# Altium PCB Acoustics Board.PcbDoc (part 3 of 3)
Units mil, origin at the board's own origin, x right, y up, seen from the top; angles counter-clockwise.
Board outline 4100 x 5000 mil, 4 copper layers (Top Layer, Middle 1 Layer, Middle 2 Layer, Bottom Layer), stack 53.912 mil thick; 240 components, 165 nets, 793 pads, 573 vias.
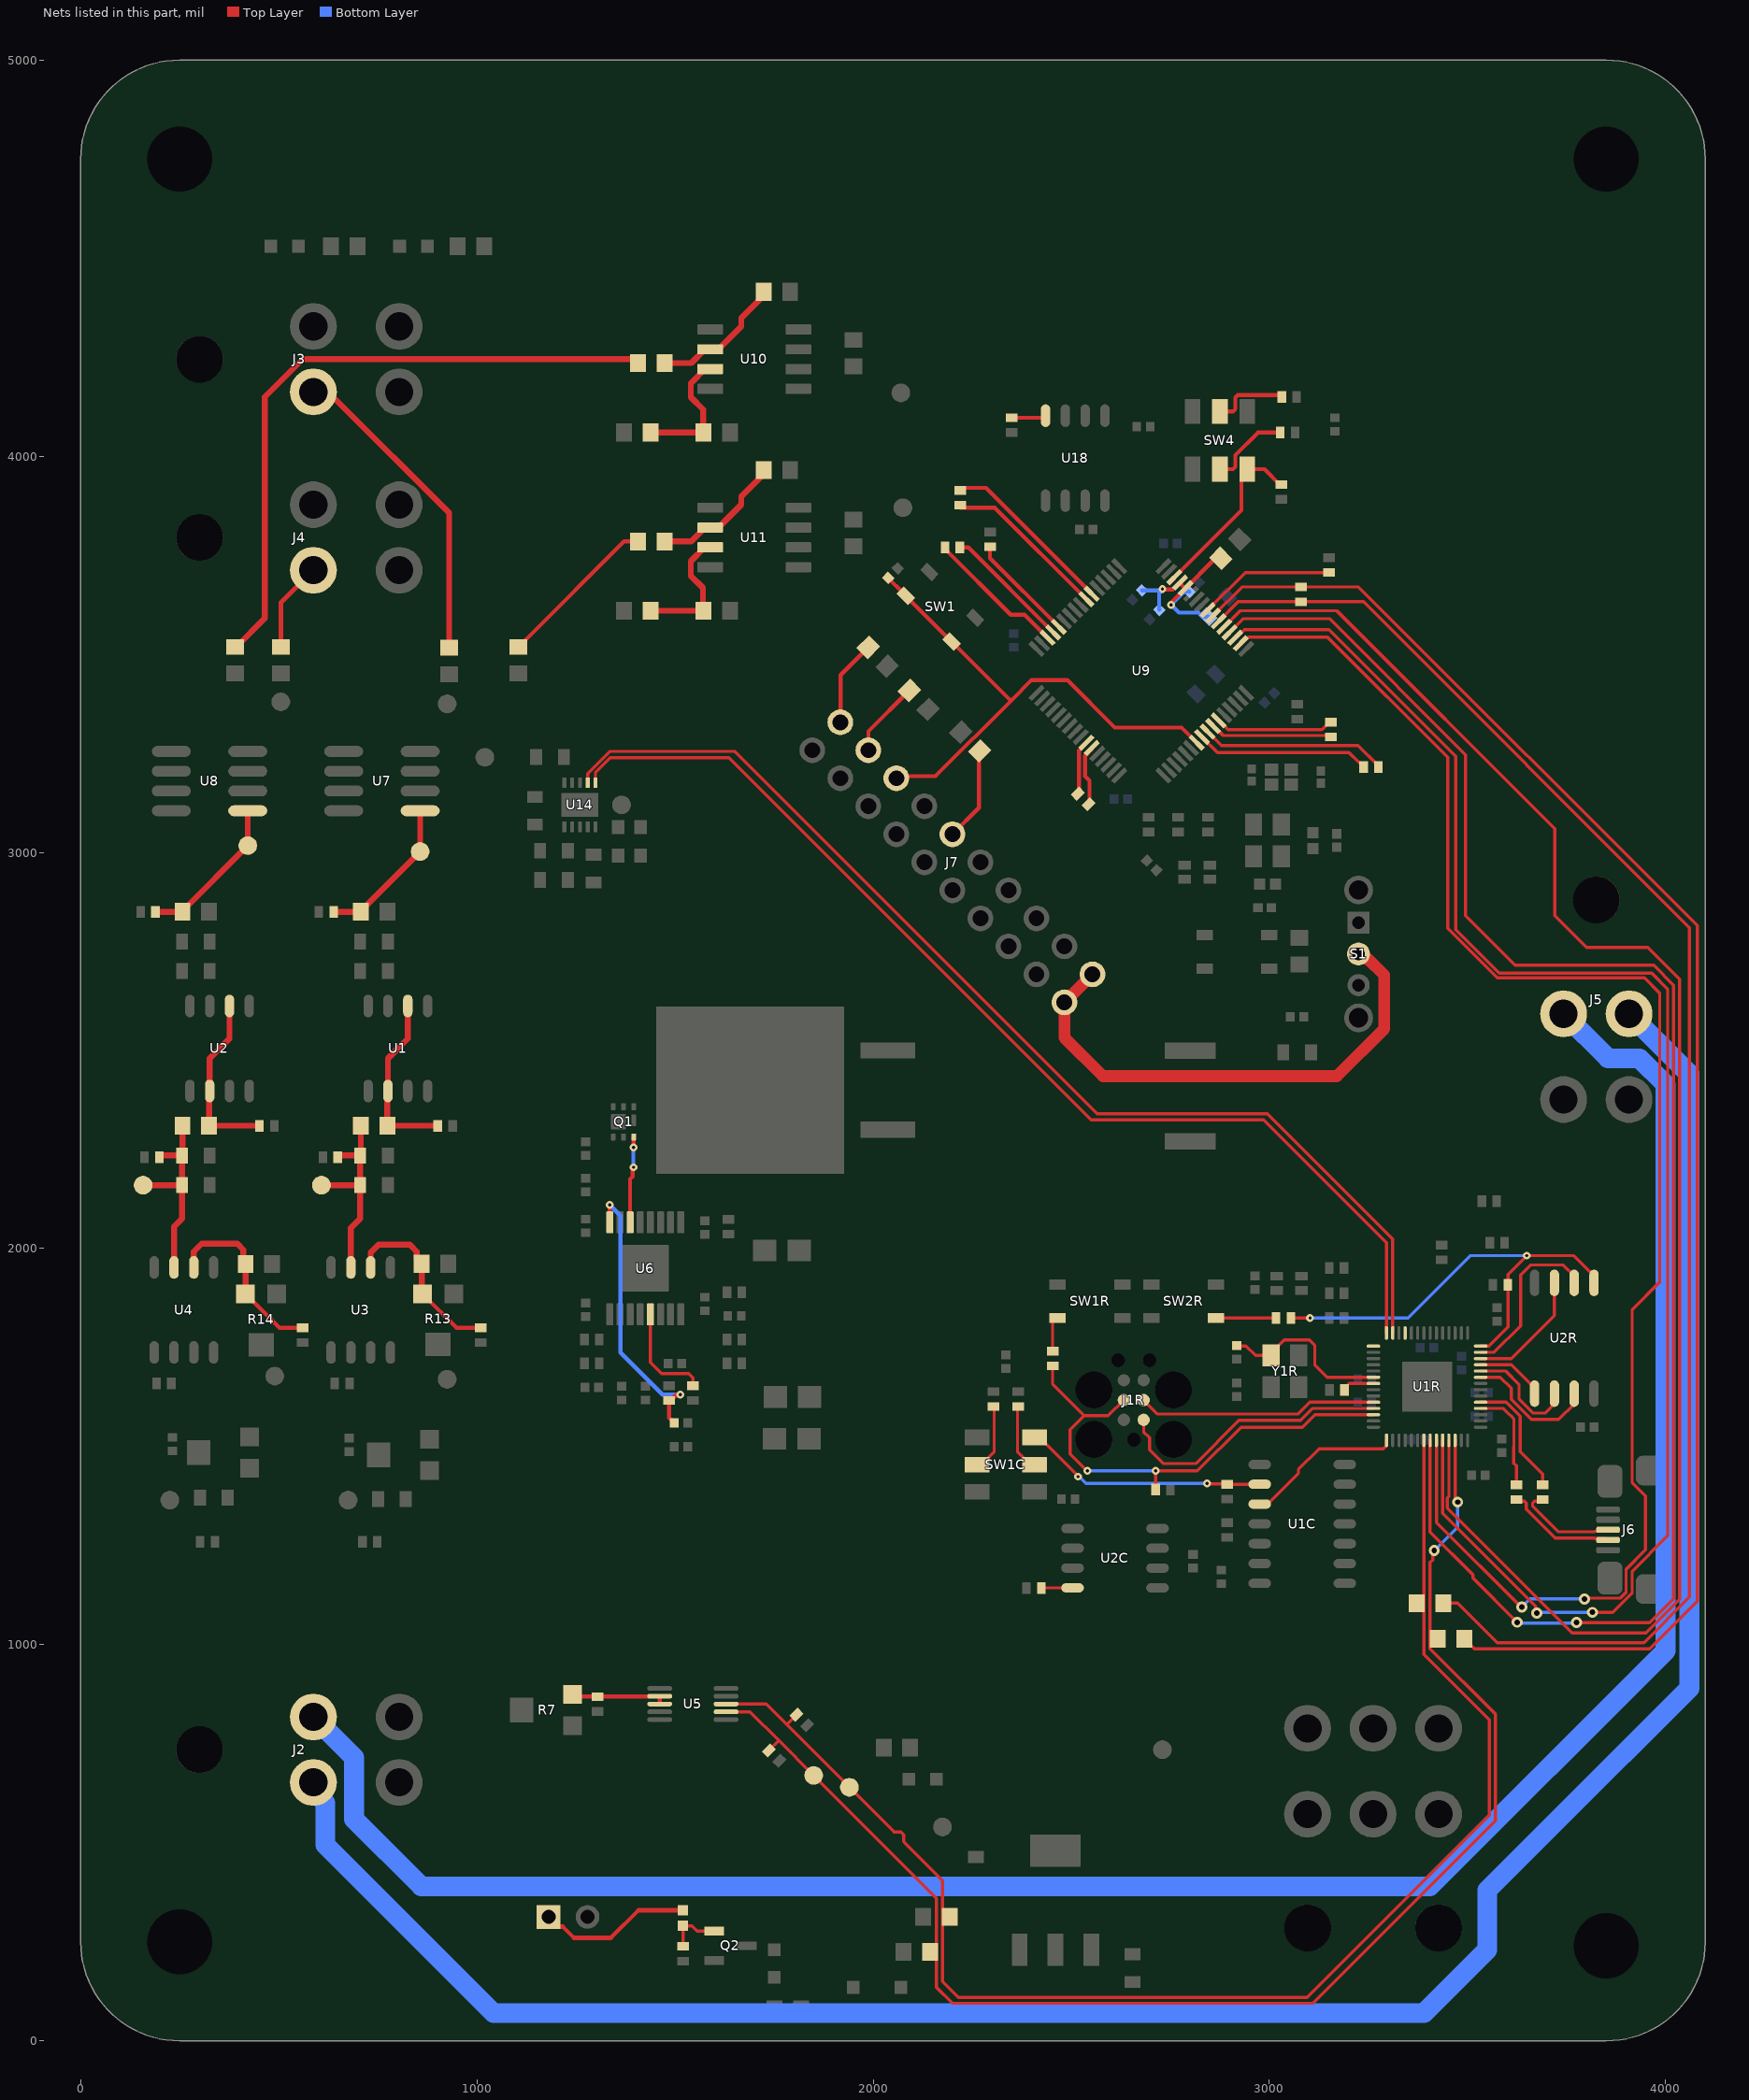
[diagram p5: the nets of this part, all layers, seen from the top]

## Via types
v1: diameter 19.68, hole 7.87, Top Layer to Bottom Layer, tented both sides, 176 vias
v2: diameter 28, hole 14, Top Layer to Bottom Layer, tented both sides, 168 vias
v3: diameter 30, hole 8, Top Layer to Bottom Layer, tented both sides, 106 vias
v4: diameter 20, hole 7.87, Top Layer to Bottom Layer, tented both sides, 99 vias
v5: diameter 31.5, hole 15.75, Top Layer to Bottom Layer, tented both sides, 19 vias
v6: diameter 24, hole 10, Top Layer to Bottom Layer, tented both sides, 3 vias
v7: diameter 23.62, hole 11.81, Top Layer to Bottom Layer, tented both sides, 2 vias

## Nets (pads, with @x,y where several pads share a name; then routed paths per layer and width w, separated by ;. In a path a pad name is that pad's centre, name@x,y a point inside that pad or via, vN(x,y) a via of type N, cw(c..) or ccw(c..) an arc to the next point about the centre after c; other vN are vias at no path point) (continued)
NetDNP7_2: DNP7.2 U9.44 | length 273.6
  Top Layer w10: DNP7.2@2295,3771.3 2295,3742.71 U9.44@2468.24,3569.47
NetDNP8_1: DNP8.1 U9.45 | length 324.4
  Top Layer w10: DNP8.1@2218.7,3770 2239.87,3770 U9.45@2454.32,3555.55
NetDNP8_2: DNP8.2 U9.46 | length 356
  Top Layer w10: DNP8.2@2181.3,3770 2181.3,3766.06 2347.36,3600 2382.03,3600 U9.46@2440.4,3541.63
NetDNP9_1: DNP9.1 U9.24 | length 345.3
  Top Layer w8: U9.24@2844.07,3611.23 2939.14,3706.3 DNP9.1@3150,3706.3
NetDNP10_1: DNP10.1 U9.58 | length 137.7
  Top Layer w10: DNP10.1@2516.78,3148.22 2519.56,3151.01 2519.56,3257.47 2537.84,3275.75 U9.58@2537.84,3277.16
NetDNP10_2: DNP10.2 U9.59 | length 151.4
  Top Layer w10: DNP10.2@2543.22,3121.78 2546.01,3124.56 2546.01,3181.35 2534.82,3192.54 2534.82,3243.47 U9.59@2551.76,3260.41
NetDNP12_1: DNP12.1 U9.9 | length 470.5
  Top Layer w8: U9.9@2844.07,3305 2879.07,3270 3223.94,3270 3275,3218.94 DNP12.1@3275,3215
NetDNP12_2: DNP12.2 U9.8 | length 441.3
  Top Layer w8: U9.8@2830.15,3291.08 2869.23,3252 3200.6,3252 3226.83,3225.76 3230.77,3225.76 3237.6,3218.94 DNP12.2@3237.6,3215
NetDNP13_1: DNP13.1 U9.11 | length 300.3
  Top Layer w8: U9.11@2871.9,3332.84 2873.32,3332.84 2896.16,3310 3132.36,3310 3151.06,3328.7 DNP13.1@3155,3328.7
NetDNP13_2: DNP13.2 U9.10 | length 306.9
  Top Layer w8: U9.10@2857.99,3318.92 2859.4,3318.92 2883.32,3295 DNP13.2@3155,3295
NetDNP14_1: DNP14.1 SB6.1 U9.23 | length 3960.8
  Top Layer w8: U9.23@2857.99,3597.31 2930.68,3670 DNP14.1@3080,3670 3225,3670 4080,2815 4080,1110 3960,990 3517,990 3510.5,996.5 3508,996.5 3492,1012.5 SB6.1@3492,1015
NetDNP14_2: DNP14.2 SB7.1 U9.22 | length 3949.8
  Top Layer w8: U9.22@2871.9,3583.39 2921.11,3632.6 DNP14.2@3080,3632.6 3237.4,3632.6 4060,2810 4060,1120 3945,1005 3575,1005 3475,1105 SB7.1@3438.5,1105
NetDNP15_1: DNP15.1 U9.39 | length 413.5
  Top Layer w10: DNP15.1@2220,3870 2306.9,3870 U9.39@2537.84,3639.07
NetDNP15_2: DNP15.2 U9.38 | length 442.4
  Top Layer w10: DNP15.2@2220,3920 2284.74,3920 U9.38@2551.76,3652.99
NetDNP16_2: DNP16.2 R9.1 R13.3 U3.2 | length 465.2
  Top Layer w9.84: R13.3@860.96,1887.47 R13.3@862.57,1885.87 948.43,1800 DNP16.2@1010,1800
  Top Layer w15: U3.2@731.94,1952.28 731.94,1990 751.94,2010 830.95,2010 848.46,1992.49 848.46,1973.99 R9.1@860.96,1961.49 R13.3@860.96,1887.47
NetDNP18_2: DNP18.2 R10.1 R14.3 U4.2 | length 472.9
  Top Layer w9.84: R14.3@416.26,1893.11 R14.3@416.26,1885.24 501.5,1800 DNP18.2@560,1800
  Top Layer w15: U4.2@285.63,1952.28 285.63,1992.28 305.63,2012.28 395.63,2012.28 410.63,1997.28 410.63,1966.29 R10.1@416.29,1960.63 416.29,1908.89 ; R14.3@416.26,1893.11 R14.3@416.26,1908.86
NetDNP20_1: DNP20.1 R3.2 U1.2 U1.6 | length 450.8
  Top Layer w15: U1.2@825.63,2612.28 825.63,2530 775.63,2480 U1.6@775.63,2397.72 774.13,2396.22 R3.2@774.13,2310 DNP20.1@901.3,2310
NetDNP24_1: DNP24.1 R4.2 U2.2 U2.6 | length 450.8
  Top Layer w15: U2.2@375.63,2612.28 375.63,2530 325.63,2480 U2.6@325.63,2397.72 324.13,2396.22 R4.2@324.13,2310 DNP24.1@451.3,2310
NetJ3_1: J3.1 SB2.1 | length 809
  Top Layer w15: J3.1@587.4,4162.32 607.13,4142.59 644.28,4142.59 930,3856.87 SB2.1@930,3517
NetJ4_1: J4.1 SB3.1 | length 228
  Top Layer w12: SB3.1@505,3518.5 505,3629.92 J4.1@587.4,3712.32
NetJ7_1: J7.1 J7.2 S1.2 | length 1308.7
  Top Layer w30: J7.1@2553.55,2692.16 J7.2@2482.84,2621.45 2482.84,2532.16 2580,2435 3170,2435 3290,2555 3290,2690 3249.26,2730.74 3245.04,2730.74 3232.04,2743.74 S1.2@3225,2743.74
NetJ7_11: J7.11 R38.2 | length 239.1
  Top Layer w10: J7.11@2200,3045.71 2266.92,3112.63 2266.92,3254.54 R38.2@2268.69,3256.31
NetJ7_17: J7.17 R39.2 | length 194
  Top Layer w10: J7.17@1987.87,3257.84 1987.87,3305.24 R39.2@2091.31,3408.69 ; J7.17@1988.58,3262.84 J7.17@1988.84,3262.84
NetJ7_19: J7.19 R40.2 | length 212.7
  Top Layer w10: J7.19@1917.87,3333.55 1917.87,3447.62 R40.2@1987.62,3517.38
NetJ8_1: J8.1 R32.1 | length 390
  Top Layer w11: J8.1@1180.79,312.83 1205.29,288.33 1216.67,288.33 1245,260 1338,260 1407.68,329.68 R32.1@1520,329.68
NetQ1_3: Q1.3 U6.14 | length 219.2
  Top Layer w9.84: U6.14@1386.61,2066.14 1386.61,2175.47 1393.12,2181.97 1393.12,2203.12 v1(1395,2205) ; v1(1395.3,2255.3) 1395.3,2281.32 Q1.3@1395.59,2281.61
  Bottom Layer w9.84: v1(1395,2205) 1395.15,2205.15 1395.15,2255.15 v1(1395.3,2255.3)
NetQ2_1: Q2.1 R31.2 R32.2 | length 135.9
  Top Layer w8: R31.2@1520,238.7 R32.2@1520,290.31 1542.59,290.31 1555.41,277.5 Q2.1@1599,277.5
NetR2C_1: R2C.1 SW1C.2 | length 172.3
  Top Layer w7.87: R2C.1@2366.34,1601.26 2364.37,1599.29 2364.37,1486.1 2395.87,1454.61 SW1C.2@2407.68,1454.61
NetR3C_1: R3C.1 SW1C.5 | length 172.3
  Top Layer w7.87: SW1C.5@2262.01,1454.61 2273.82,1454.61 2305.32,1486.1 2305.32,1599.29 R3C.1@2303.35,1601.26
NetR6C_1: R6C.1 U2C.8 | length 78.7
  Top Layer w7.87: R6C.1@2424.41,1143.39 U2C.8@2503.15,1143.39
NetR6R_1: R6R.1 SW1R.A2 | length 91.3
  Top Layer w7.87: R6R.1@2452.95,1741.02 2452.95,1815.83 2461.81,1824.68 SW1R.A2@2465.75,1824.68
NetR7_3: R7.3 R8.1 U5.2 U5.3 | length 242.9
  Top Layer w10: R7.3@1240.87,874.68 1246.54,869.02 R8.1@1305,869.02 1434.27,869.02 1435.26,870 U5.2@1461.34,870 U5.3@1461.34,850.31
NetR7R_1: R7R.1 SW2R.A1 | length 151.6
  Top Layer w7.87: SW2R.A1@2865.35,1824.68 R7R.1@3016.93,1824.68
NetR12_1: R12.1 SB4.1 | length 1654.9
  Top Layer w15: SB4.1@390,3518.5 392.5,3518.5 465,3591 465,4150 560,4245 1402.4,4245 R12.1@1412.4,4235
NetR12_2: R12.2 R23.2 U10.2 | length 350.6
  Top Layer w15: R12.2@1467.6,4235 1540.98,4235 1575.98,4270 1592.72,4270 1609.45,4270 1667.13,4327.68 1667.13,4348.75 1728.46,4410.08 R23.2@1728.46,4415
NetR20_2: R20.2 U6.5 | length 264.8
  Top Layer w8: U6.5@1437.8,1833.86 1437.8,1712.2 1465.63,1684.37 1534.27,1684.37 1545,1673.63 R20.2@1545,1653.7
NetR24_1: R24.1 R25.1 U10.3 | length 337.7
  Top Layer w15: R25.1@1438.5,4060 R24.1@1571.5,4060 1571.5,4117.62 1540,4149.12 1540,4184.02 1575.98,4220 U10.3@1592.72,4220
NetR26_1: R26.1 SB5.1 | length 413.4
  Top Layer w10: SB5.1@1105,3518.5 1107.5,3518.5 1122.5,3533.5 1122.5,3536 1371.5,3785 R26.1@1406.5,3785
NetR26_2: R26.2 R27.2 U11.2 | length 350.6
  Top Layer w15: R26.2@1467.6,3785 1540.98,3785 1575.98,3820 1592.72,3820 1609.45,3820 1667.13,3877.68 1667.13,3898.75 1728.46,3960.08 R27.2@1728.46,3965
NetR28_1: R28.1 R29.1 U11.3 | length 320.1
  Top Layer w15: R29.1@1437.52,3610 1570.52,3610 1570.52,3667.62 1540,3698.14 1540,3735 U11.3@1575,3770
NetR41_1: R41.1 U18.8 | length 87
  Top Layer w10: R41.1@2350,4097.4 2430.12,4097.4 U18.8@2435,4102.28
NetR44_1: R44.1 SW4.2 | length 208.5
  Top Layer w10: SW4.2@2875,3967.17 2908.35,3967.17 2914.21,3973.02 2914.21,4002.8 2971.41,4060 R44.1@3027.6,4060
NetR46_1: R46.1 SW4.5 | length 192.7
  Top Layer w10: SW4.5@2875,4112.83 2908.35,4112.83 2914.21,4118.69 2914.21,4148.47 2920.07,4154.33 3026.97,4154.33 R46.1@3031.3,4150
NetU1R_11: U1R.11
NetU1R_15: U1R.15
"Point Filter L": DNP19.1 R1.2 TP5.TP U7.5 | length 385.4
  Top Layer w15: DNP19.1@638.7,2850 R1.2@707.13,2850 707.13,2852.5 TP5.TP@856.77,3002.14 U7.5@856.77,3105
"Point Filter R": DNP23.1 R2.2 TP6.TP U8.5 | length 391.6
  Top Layer w15: DNP23.1@188.7,2850 R2.2@257.13,2850 257.13,2852.5 TP6.TP@421.77,3017.14 U8.5@421.77,3105
"Post Filter Amp L": C3.1 DNP21.1 L3.1 R3.1 TP1.TP U3.3 | length 526.1
  Top Layer w15: TP1.TP@607.63,2160 C3.1@705.63,2160 ; DNP21.1@648.7,2230 648.7,2231.67 652.03,2235 L3.1@705.63,2235 ; U3.3@681.94,1952.28 681.94,2051.62 705.63,2075.32 C3.1@705.63,2160 ; R3.1@707.13,2310 707.13,2236.5 L3.1@705.63,2235 ; C3.1@705.63,2160 L3.1@705.63,2235
"Post Filter Amp R": C4.1 DNP25.1 L4.1 R4.1 TP4.TP U4.3 | length 524.6
  Top Layer w15: TP4.TP@157.63,2160 C4.1@255.63,2160 ; DNP25.1@198.7,2230 198.7,2231.67 202.03,2235 L4.1@255.63,2235 ; U4.3@235.63,1952.28 235.63,2055.32 255.63,2075.32 C4.1@255.63,2160 ; R4.1@257.13,2310 257.13,2236.5 L4.1@255.63,2235 ; C4.1@255.63,2160 L4.1@255.63,2235
QSPI_SCLK_RP2040: U1R.52 U2R.6 | length 283
  Top Layer w7.87: U1R.52@3533.17,1690.83 3595.87,1690.83 3630.12,1656.57 3630.12,1620.04 3665.63,1584.53 3695.67,1584.53 3719.29,1608.15 U2R.6@3719.29,1629.8
QSPI_SD0_RP2040: U1R.53 U2R.5 | length 178.4
  Top Layer w7.87: U1R.53@3533.17,1706.57 3610.43,1706.57 3669.29,1647.72 U2R.5@3669.29,1633.8 U2R.5@3669.29,1629.8
QSPI_SD1_RP2040: U1R.55 U2R.2 | length 435.6
  Top Layer w7.87: U1R.55@3533.17,1738.07 3567.13,1738.07 3634.06,1805 3634.06,1933.15 3659.51,1958.6 3729.08,1958.6 3729.13,1958.54 3741.73,1958.54 3769.29,1930.98 U2R.2@3769.29,1913.32 U2R.2@3769.29,1909.33
QSPI_SD2_RP2040: U1R.54 U2R.3 | length 309.4
  Top Layer w7.87: U1R.54@3533.17,1722.32 3610.43,1722.32 3719.29,1831.18 U2R.3@3719.29,1909.33
QSPI_SD3_RP2040: U1R.51 U2R.7 | length 334.1
  Top Layer w7.87: U1R.51@3533.17,1675.08 3582.65,1675.08 3610.43,1647.29 3610.43,1619.96 3661.61,1568.78 3729.92,1568.78 3769.29,1608.15 U2R.7@3769.29,1629.8
QSPI_SS_RP2040: R5R.2 R7R.2 U1R.56 U2R.1 | length 1162
  Top Layer w7.87: R7R.2@3054.33,1824.68 v1(3102.56,1824.69) ; U1R.56@3533.17,1753.82 3554.07,1753.82 3602.56,1802.3 3602.56,1934.92 v1(3649.8,1982.17) 3768.11,1982.17 3819.29,1930.98 U2R.1@3819.29,1913.32 U2R.1@3819.29,1909.33
  Bottom Layer w7.87: v1(3102.56,1824.69) 3349.55,1824.69 3507.03,1982.17 v1(3649.8,1982.17)
Reset: C22.1 J7.15 SW1.A1 SW1.A2 U9.7 | length 1371.5
  Top Layer w10: C22.1@2037.89,3684.37 C22.1@2037.89,3692.89 2074.88,3655.9 2074.88,3655.19 2345.07,3385 2350,3385 ; J7.15@2059.29,3192.13 2157.13,3192.13 2350,3385 ; U9.7@2816.23,3277.16 2778.39,3315 2610,3315 2490,3435 2400,3435 2350,3385
"RP2040 L": DNP27.1 R35.1 SB7.2 TP9.TP U1R.35 U5.8 | length 3632.7
  Top Layer w8: U5.8@1628.66,850.31 1729.83,850.31 1781.85,798.29 ; DNP27.1@1806.78,823.22 1782.29,798.73 1781.85,798.29 ; TP9.TP@1940,640 2049.58,530.42 2052.41,527.59 2069.72,527.59 2076.79,520.52 2076.79,503.21 2079.62,500.38 2175,405 2175,150 2215,110 3095,110 3555,570 3555,810 3390,975 U1R.35@3389.96,1516.12 U1R.35@3389.96,1516.12 ; TP9.TP@1940,640.14 1781.85,798.29
"RP2040 R": DNP28.1 R34.1 SB6.2 TP10.TP U1R.40 U5.7 | length 3664
  Top Layer w8: U5.7@1628.66,830.63 1689.23,830.63 1761.71,758.15 ; DNP28.1@1736.78,733.22 1761.27,757.71 1761.71,758.15 ; TP10.TP@1849.86,670 1761.71,758.15 ; TP10.TP@1850,670 2160,360 2160,135 2200,95 3110,95 3570,555 3570,825 3405.71,989.29 3405.71,1207.53 3412.05,1213.87 3412.05,1233.71 v2(3415.87,1237.53) ; U1R.40@3468.7,1516.12 3468.7,1371.71 3475,1365.41 v2(3475,1360)
  Bottom Layer w8: v2(3415.87,1237.53) 3475,1296.66 v2(3475,1360)
RUN_RP2040: J1R.4 R4R.2 R6R.2 U1R.26 | length 1275.3
  Top Layer w7.87: R6R.2@2452.95,1703.62 2452.95,1657.73 2532.64,1578.04 ; v1(2540.89,1438.86) 2539.57,1438.86 2497.24,1481.19 2497.24,1542.63 2532.64,1578.04 ; J1R.4@2632.68,1617.6 2593.11,1578.04 2532.64,1578.04 ; R4R.2@2712.8,1391.61 v1(2712.8,1438.86) 2818.34,1438.86 2928.57,1549.09 3083.49,1549.09 3114.99,1580.59 U1R.26@3262.5,1580.59
  Bottom Layer w7.87: v1(2540.89,1438.86) v1(2712.8,1438.86)
SCK_RP2CAN: U1C.10 U1R.29 | length 400.1
  Top Layer w7.87: U1C.10@2975.59,1355 2995.84,1355 3073.21,1432.37 3073.21,1442.14 3125.44,1494.37 3287.01,1494.37 3295.47,1502.83 U1R.29@3295.47,1516.12
SCLK: U1R.13 U14.7 | length 2824.7
  Top Layer w7.87: U14.7@1279.68,3175.71 1279.68,3198.54 1336.15,3255 1650,3255 2565,2340 2995,2340 3311.22,2023.78 U1R.13@3311.22,1786.79
SDATA: U1R.14 U14.6 | length 2772.6
  Top Layer w7.87: U14.6@1299.37,3175.71 1299.37,3202.08 1336.15,3238.85 1636.15,3238.85 2550,2325 2985,2325 3295.47,2014.53 U1R.14@3295.47,1786.79
SPI1_CLK: U1R.38 U9.19 | length 4089.5
  Top Layer w8: U9.19@2913.66,3541.63 2916.49,3541.63 2937.46,3562.6 3150,3562.6 3470,3242.6 3470,2805 3580,2695 3965,2695 4005,2655 4005,1275 3915.57,1185.57 3915.57,1131.25 3866.06,1081.75 v2(3815,1081.75) ; U1R.38@3437.2,1516.12 3437.2,1331.47 3671.45,1097.22 3671.45,1083.55 v2(3675,1080)
  Bottom Layer w8: v2(3675,1080) 3676.75,1081.75 v2(3815,1081.75)
SPI1_MISO: U1R.36 U9.20 | length 4276.5
  Top Layer w8: U9.20@2899.74,3555.55 2934.19,3590 3151.4,3590 3495,3246.4 3495,2840 3620,2715 3970,2715 4020,2665 4020,1116.32 3959.55,1055.87 v2(3775,1055.87) ; U1R.36@3405.71,1516.12 3405.71,1284.29 3513.44,1176.56 3513.44,1168.31 v2(3625,1056.75)
  Bottom Layer w8: v2(3625,1056.75) 3627.62,1054.13 3773.25,1054.13 v2(3775,1055.87)
SPI1_MOSI: U1R.39 U9.21 | length 4169.2
  Top Layer w8: U9.21@2885.82,3569.47 2926.36,3610 3170,3610 3720,3060 3720,2840 3800,2760 3955,2760 4035,2680 4035,1115 3950,1030 3764.28,1030 3449.13,1345.16 3449.13,1370.72 3452.95,1374.54 U1R.39@3452.95,1516.12
STM_CSn: U1R.37 U9.18 | length 4055.4
  Top Layer w8: U9.18@2927.58,3527.71 2930.41,3527.71 2946.35,3543.65 3146.35,3543.65 3450,3240 3450,2808.68 3575.22,2683.46 3946.54,2683.46 3985,2645 3985,1915.68 3915.57,1846.25 3915.57,1408.85 3949.42,1375 3949.42,1239.42 3900.1,1190.1 3900.1,1132.11 3885.61,1117.61 3797.61,1117.61 v2(3795,1115) ; U1R.37@3421.46,1516.12 3421.46,1308.54 3634.79,1095.21 v2(3636.88,1095.21)
  Bottom Layer w8: v2(3636.88,1095.21) 3657.85,1116.19 v2@3795,1116.19
SWCLK_RP2040: J1R.3 U1R.24 | length 606.9
  Top Layer w7.87: J1R.3@2682.68,1617.6 2718.11,1582.16 3072.01,1582.16 3101.94,1612.09 U1R.24@3262.5,1612.09
SWDIO_RP2040: J1R.1 U1R.25 | length 718.6
  Top Layer w7.87: J1R.1@2682.68,1567.6 2682.68,1537.06 2697.24,1522.49 2697.24,1492.56 2732.64,1457.16 2813.89,1457.16 2923.14,1566.41 3078.54,1566.41 3108.46,1596.34 U1R.25@3262.5,1596.34
TERM_DET_RP2CAN: R1C.2 SW1C.3 U1C.9 | length 621.6
  Top Layer w7.87: SW1C.3@2407.68,1523.5 2419.49,1523.5 2517.46,1425.53 v1(2517.46,1424.35) ; v1(2842.72,1407.36) 2843.9,1406.18 2896.65,1406.18 R1C.2@2897.83,1405 ; R1C.2@2893.9,1405 R1C.2@2897.83,1405 ; U1C.9@2975.59,1405 R1C.2@2897.83,1405
  Bottom Layer w7.87: v1(2517.46,1424.35) 2519.75,1424.35 2536.74,1407.36 v1(2842.72,1407.36)
TERM_DET_STM: R42.2 SW4.3 U9.30 | length 450.4
  Top Layer w10: U9.30@2760.55,3694.74 2929.21,3863.41 2929.21,3952.48 SW4.3@2943.9,3967.17 2987.6,3967.17 3026.06,3928.7 R42.2@3030,3928.7
"Transducer L": J2.2 J5.1 | length 5687.6
  Bottom Layer w50: J2.2@587.4,817.68 690,715.08 690,560 860,390 3405,390 4000,985 4000,2413.75 3933.75,2480 3854.92,2480 J5.1@3742.32,2592.6
"Transducer R": J2.1 J5.2 | length 5981.8
  Bottom Layer w50: J2.1@587.4,652.32 587.4,631.19 617.4,601.19 617.4,494.6 1042,70 3390,70 3550,230 3550,380 3720,550 4060,890 4060,2440.28 J5.2@3907.68,2592.6
USB_N: J6.2 R3R.1 | length 282.6
  Top Layer w7.87: R3R.1@3623.32,1366.38 3627.1,1362.6 3643.77,1362.6 3648.38,1357.99 3648.38,1342.58 3721.7,1269.27 3820.54,1269.27 3821.47,1268.35 3850.75,1268.35 J6.2@3854.69,1264.41
USB_P: J6.3 R2R.1 | length 256.3
  Top Layer w7.87: R2R.1@3689.33,1366.38 3685.54,1362.6 3668.87,1362.6 3664.26,1357.99 3664.26,1349.16 3728.27,1285.14 3820.54,1285.14 3821.47,1286.06 3850.75,1286.06 J6.3@3854.69,1290
USB_RP2040_N: R3R.2 U1R.46 | length 263.6
  Top Layer w7.87: U1R.46@3533.17,1596.34 3590.75,1596.34 3600.15,1586.93 3612.84,1574.25 3616.9,1570.19 3616.9,1498.74
  Top Layer w8: 3616.9,1498.74 3616.9,1458.11 3623.32,1451.69 R3R.2@3623.32,1403.78
USB_RP2040_P: R2R.2 U1R.47 | length 310.5
  Top Layer w7.87: U1R.47@3533.17,1612.09 3597.27,1612.09 3606.68,1602.68 3632.83,1576.52 3632.83,1487.42 3632.9,1487.36
  Top Layer w8: 3632.9,1487.36 3632.9,1487.11 3689.33,1430.68 R2R.2@3689.33,1403.78
VCC: C14.1 R17.1 U6.16 | length 718.6
  Top Layer w11: v1(1335,2110) 1335.22,2109.78 1335.22,2066.36 U6.16@1335.43,2066.14 ; C14.1@1497.87,1560 1497.87,1560.79 1492.35,1566.31 1491.56,1566.31 1485,1572.87 R17.1@1485,1616.3 1488.94,1616.3 1502.03,1629.39 1511.3,1629.39 v1(1512.96,1631.05)
  Bottom Layer w11: v1(1335,2110) 1362.26,2082.74 1362.26,1737.74 1468.95,1631.05 v1(1512.96,1631.05)
VDDA: C25.1 C26.1 C27.1 C28.1 SB1.1 U9.28 U9.29 | length 496.3
  Top Layer w10: v4(2730,3665) 2731.12,3663.88 2756.11,3663.88 2773.05,3680.82 2786.97,3666.9 U9.28@2788.39,3666.9 ; v4(2751.78,3625) 2753.69,3626.91 2753.69,3632.21 U9.28@2788.39,3666.9 ; SB1.1@2858.11,3736.63 U9.28@2788.39,3666.9
  Bottom Layer w10: C26.1@2678.38,3661.79 2678.93,3661.23 v4@2723.53,3661.23 ; C27.1@2722.11,3613.22 C27.1@2722.11,3612.11 2721.55,3612.67 2721.55,3653.85 2730,3662.29 v4(2730,3665) ; C25.1@2797.89,3657.89 2797.33,3658.45 2788.81,3658.45 2786.47,3656.1 2782.88,3656.1 v4(2751.78,3625) 2771.78,3605 2820.86,3605 2830.86,3595 C28.1@2845,3595
XIN_RP2040: C1R.1 U1R.20 Y1R.1 | length 443.1
  Top Layer w7.87: C1R.1@2917.52,1755.2 2918.8,1753.92 2941.14,1753.92 2964.86,1730.2 Y1R.1@3004.13,1730.2 3004.13,1736.1 3037.6,1769.57 3100.68,1769.57 3114.37,1755.88 3114.37,1706.57 3145.87,1675.08 U1R.20@3262.5,1675.08
XOUT_RP2040: R1R.1 U1R.21 | length 82.1
  Top Layer w7.87: R1R.1@3189.25,1643.58 3189.25,1647.52 3201.06,1659.33 U1R.21@3262.5,1659.33
pads on no net: DNP9.2 J1. J1R.A J1R.B J1R.C J1R.D J1R.E J1R.F J1R.G J2. J3. J4. J5. J6.4 R5.1 R6.1 R7.1 R13.1 R14.1 S1.1 S1.4 S1.5 SW1R.A1 SW2R.A2 U1.1 U1.5 U1.8 U1C.3 U1C.5 U1C.8 U2.1 U2.5 U2.8 U3.1 U3.5 U3.8 U4.1 U4.5 U4.8 U9.14 U9.17 U9.26 U9.33 U9.36 U9.40 U9.41 U9.42 U9.52 U9.55 U9.60 U9.62 U10.1 U10.5 U10.8 U11.1 U11.5 U11.8 Y1.1

## Polygon pours and split planes (outlines as drawn)
5V on Top Layer "5V_L01_P099" (solid, pour order 99): 1445,1540 1235,1540 1170,1605 1170,2025 1215,2070 1215,2085 1155,2145 1095,2145 1050,2100 1050,1485 1155,1380 1455,1380 1505,1430 1505,1480
5V on Top Layer "5V_L01_P113" (solid, pour order 113): 1620,1095 1290,1095 1050,1335 1050,1500 1090,1540 1490,1540 1510,1520 1510,1475 1545,1440 2010,1440 2025,1425 2115,1335 2115,1230 1800,915
5V on Top Layer "5V_L01_P091" (solid, pour order 91): 1299.37,2110.63 1305,2105 1305,2067.96 1298.2,2061.16 1088.84,2061.16 1050,2100 1050,2230 1090,2270 1190,2270 1220,2240 1220,2151.54 1260.91,2110.63
GND on Top Layer "GND_L01_P161" (solid, remove dead copper, pour order 161): 0,5000 4100,5000 4100,0 0,0
5V on Top Layer "5V_L01_P011" (solid, pour order 11): 930,2445 1050,2325 1050,2230 1080,2200 1200,2200 1220,2220 1220,2280 1240,2300 1290,2300 1321.18,2268.82 1373.82,2268.82 1380,2275 1380,2307.33 1380,2450 1280,2550 910,2550 890,2530 890,2480
GND on Top Layer "GND_L01_P160" (solid, remove dead copper, pour order 160): 1805,1655 1890,1655 1890,1490 1805,1490
-5V on Top Layer "-5V_L01_P085" (solid, pour order 85): 1782.57,1635 1782.57,1470 1530,1470 1515,1485 1515,1615 1535,1635
3V3_STM32 on Top Layer "3V3_STM32_L01_P147" (solid, remove dead copper, pour order 147): 2565,2640 3059.62,2640 3059.62,2470 2565,2470
3V3 on Top Layer "3V3_L01_P145" (solid, pour order 145): 1185,2910 1185,2790 1335,2640 2000,2640 2630,2010 2835,2010 2910,2085 2910,2235 2850,2295 2550,2295 1995,2850 1320,2850 1245,2925 1200,2925
-5V on Top Layer "-5V_L01_P136" (solid, pour order 136): 270,3180 285,3165 285,3150 270,3135 180,3135 165,3120 165,3090 180,3075 285,3075 315,3045 315,3000 285,2970 165,2970 135,3000 135,3155.04 159.96,3180
-5V on Top Layer "-5V_L01_P121" (solid, pour order 121): 705,3180 720,3165 720,3150 705,3135 615,3135 600,3120 600,3090 615,3075 720,3075 750,3045 750,3000 720,2970 600,2970 570,3000 570,3155.04 594.96,3180
5V on Top Layer "5V_L01_P120" (solid, pour order 120): 915,2925 960,2925 990,2955 990,3150 960,3180 810,3180 795,3165 795,3150 810,3135 900,3135 915,3120 915,3030 885,3000 885,2955
5V on Top Layer "5V_L01_P119" (solid, pour order 119): 480,2925 525,2925 555,2955 555,3150 525,3180 375,3180 360,3165 360,3150 375,3135 465,3135 480,3120 480,3030 450,3000 450,2955
5V on Top Layer "5V_L01_P118" (solid, pour order 118): 1267.74,1744.14 1189.14,1744.14 1155,1710 1095,1710 1080,1725 1080,1845 1110,1875 1155,1875 1185,1845 1243.49,1845 1289.9,1798.59 1289.9,1752.21 1281.83,1744.14
-5V on Top Layer "-5V_L01_P115" (solid, pour order 115): 1417.78,816.92 1508.08,816.92 1530,795 1530,765 1530,675 1500,645 1425,645 1395,675 1395,795
-5V on Top Layer "-5V_L01_P109" (solid, pour order 109): 615,2670 720,2670 750,2640 750,2580 735,2565 615,2565 600,2580 600,2655
-5V on Top Layer "-5V_L01_P108" (solid, pour order 108): 165,2670 270,2670 300,2640 300,2580 285,2565 165,2565 150,2580 150,2655
5V on Top Layer "5V_L01_P107" (solid, pour order 107): 800.63,2480.63 800.63,2364.37 810,2355 840,2355 855,2370 855,2430 870,2445 930,2445 945,2460 945,2535 930,2550 870,2550 810,2490
5V on Top Layer "5V_L01_P106" (solid, pour order 106): 350.63,2480.63 350.63,2364.37 360,2355 390,2355 405,2370 405,2430 420,2445 480,2445 495,2460 495,2535 480,2550 420,2550 360,2490
-5V on Top Layer "-5V_L01_P105" (solid, pour order 105): 566.31,2100 551.31,2085 551.31,1950 596.31,1905 641.31,1905 656.31,1920 656.31,2085 641.31,2100
5V on Top Layer "5V_L01_P104" (solid, pour order 104): 626.31,1785 688.2,1785 706.94,1766.26 706.94,1704.37 716.31,1695 746.31,1695 761.31,1710 761.31,1830 701.31,1890 626.31,1890 611.31,1875 611.31,1800
5V on Top Layer "5V_L01_P103" (solid, pour order 103): 180,1785 241.89,1785 260.63,1766.26 260.63,1704.37 270,1695 300,1695 315,1710 315,1830 255,1890 180,1890 165,1875 165,1800
-5V on Top Layer "-5V_L01_P101" (solid, pour order 101): 120,2100 105,2085 105,1950 150,1905 195,1905 210,1920 210,2085 195,2100
-5V on Top Layer "-5V_L01_P087" (solid, pour order 87): 1439.15,1633.28 1446.27,1626.15 1446.27,1596.27 1400,1550 1240,1550 1185,1605 1185,1710 1210,1735 1280,1735 1288.37,1726.63 1288.37,1629.68 1298.05,1620 1335,1620 1348.28,1633.28
5V on Top Layer "5V_L01_P098" (solid, pour order 98): 2595,630 2490,735 1980,735 1770,945 1770,1230 1890,1350 2100,1350 2550,900 2775,900 2850,825 2850,705 2775,630
3V3 on Top Layer "3V3_L01_P097" (solid, pour order 97): 2535,450 2214.34,443.82 2115,543.16 2115,650 2185,720 2460,720 2574.34,605.66 2574.34,488.82
-5V on Top Layer "-5V_L01_P094" (solid, pour order 94): 1755,2050.29 1755,1950 1560,1950 1492.62,2017.38 1475.59,2017.38 1453.75,2039.23 1453.75,2093.82 1457.6,2097.68 1468.68,2097.68 1473.5,2092.86 1473.5,2038.58 1481.89,2030.19 1535.19,2030.19 1555.29,2050.29
GND on Top Layer "GND_L01_P088" (solid, pour order 88): 1292.55,2052.45 1242.45,2052.45 1230,2040 1230,1875 1257.7,1847.3 1292.3,1847.3 1320,1875 1365,1875 1395,1905 1395,1995 1380.87,2009.13 1335.87,2009.13
5V on Top Layer "5V_L01_P090" (solid, pour order 90): 1340.53,1866.89 1343.94,1863.48 1343.94,1806.25 1338.02,1800.34 1297.66,1800.34 1289.9,1792.57 1289.9,1752.21 1281.83,1744.14 1253.64,1744.14 1240.35,1757.43 1240.35,1830.03 1249.4,1839.08 1290.22,1839.08 1318.03,1866.89
3V3 on Top Layer "3V3_L01_P083" (solid, pour order 83): 1140,1065 1185,1020 1185,690 1140,645 1035,645 990,690 990,1020 1035,1065
GND on Top Layer "GND_L01_P081" (solid, pour order 81): 3885,1365 3900,1350 3900,1230 3885,1215 3825,1215 3810,1200 3810,1125 3855,1080 4005,1080 4020,1095 4020,1485 4005,1500 3855,1500 3810,1455 3810,1380 3825,1365
3V3 on Top Layer "3V3_L01_P062" (solid, pour order 62): 1193.36,3038.36 1236.64,3038.36 1260,3015 1260,2910 1245,2895 1200,2895 1185,2910 1185,3030
3V3 on Top Layer "3V3_L01_P075" (solid, pour order 75): 1095,3180 1170,3180 1185,3165 1185,3105 1170,3090 1050,3090 1035,3105 1035,3165 1050,3180
GND on Top Layer "GND_L01_P079" (solid, pour order 79): 2280,420 2400,300 2400,180 2355,135 2220,135 2190,165 2190,390 2220,420
GND on Top Layer "GND_L01_P077" (solid, pour order 77): 2905.83,105 3000,199.17 3000,315 3180,495 3180,600 3120,660 2970,660 2865,555 2865,345 2693.82,173.82 2629.65,173.82 2610,154.17 2610,120 2625,105
5V on Top Layer "5V_L01_P076" (solid, pour order 76): 2689.65,188.82 2850,349.17 2850,570 2955,675 3120,675 3180,735 3180,840 3120,900 2745,900 2595,750 2595,344.48 2514.34,263.82 2514.34,173.82 2544.34,143.82 2574.34,143.82 2619.34,188.82
3V3 on Top Layer "3V3_L01_P061" (solid, pour order 61): 2259.34,533.82 2214.34,488.82 2214.34,443.82 2229.34,428.82 2286.18,428.82 2409.34,305.66 2409.34,158.82 2424.34,143.82 2484.34,143.82 2499.34,158.82 2499.34,293.82 2574.34,368.82 2574.34,488.82 2529.34,533.82
3V3_STM32 on Bottom Layer "Bottom Layer-3V3_STM32 1" (solid, remove dead copper, pour order 156): 1757.5,3287.5 2360,3830 1850,4340 1757.5,4340
3V3_STM32 on Bottom Layer "Bottom Layer-3V3_STM32" (solid, remove dead copper, pour order 152): 2575,2470 2910,2470 3260,2820 3260,3850 2320,3850 1935,3465 1757.5,3287.5
5V on Bottom Layer "5V_L04_P132" (solid, pour order 132): 1510,4075 1160,4425 860,4425 780,4425 705,4350 705,3690 840,3555 1080,3555 1470,3165 1470,2820 1365,2715 1095,2715 1065,2685 1065,2550 1170,2445 1320,2445 1470,2295 1650,2295 1710,2355 1710,3555 1510,3753.26
-5V on Bottom Layer "-5V_L04_P134" (solid, pour order 134): 15,2865 150,2730 240,2730 300,2790 300,3045 120,3225 120,3345 390,3615 630,3615 660,3645 660,3750 570,3840 105,3840 15,3750
-5V on Bottom Layer "-5V_L04_P133" (solid, pour order 133): 690,4335 600,4425 355,4425 15,4085 15,3720 120,3615 630,3615 690,3675
5V on Bottom Layer "5V_L04_P131" (solid, pour order 131): 990,3015 1050,2955 1050,2850 1470,2430 1710,2430 2205,1935 2205,1215 2040,1050 1785,1050 1785,1515 1800,1530 1800,1965 1320,2445 855,2445 810,2490 810,2925 900,3015
5V on Bottom Layer "5V_L04_P130" (solid, pour order 130): 855,3030 975,3030 990,3015 990,2505 930,2445 690,2445 675,2460 675,2490 765,2580 765,2640 510,2895 510,2910 525,2925 750,2925
5V on Bottom Layer "5V_L04_P128" (solid, pour order 128): 413.62,2548.31 415.31,2550 930,2550 945,2535 945,2460 930,2445 405,2445 390,2460 390,2520 420,2550 442.5,2550
-5V on Bottom Layer "-5V_L04_P127" (solid, pour order 127): 375,2670 300,2745 270,2745 240,2715 240,2655 270,2625 360,2625 375,2640
-5V on Bottom Layer "-5V_L04_P126" (solid, pour order 126): 150,2115 135,2100 135,1980 150,1965 255,1965 360,2070 360,2100 285,2190 285,2505 345,2565 345,2610 315,2640 180,2640 150,2610
-5V on Bottom Layer "-5V_L04_P125" (solid, pour order 125): 210,3075 150,3015 150,2580 165,2565 240,2565 300,2625 300,2970
-5V on Bottom Layer "-5V_L04_P124" (solid, pour order 124): 750,2640 720,2670 165,2670 150,2655 150,2580 165,2565 735,2565 750,2580
5V on Bottom Layer "5V_L04_P123" (solid, pour order 123): 480,3030 525,3030 600,2955 780,2955 855,3030 975,3030 990,3015 990,2955 930,2895 510,2895 450,2955 450,3000
-5V on Bottom Layer "-5V_L04_P122" (solid, pour order 122): 750,3075 720,3105 240,3105 210,3075 210,2955 240,2925 300,2925 420,3045 525,3045 600,2970 720,2970 750,3000
-5V on Bottom Layer "-5V_L04_P117" (solid, pour order 117): 1470,2100 1560,2010 1560,1755 1395,1590 1185,1590 840,1935 135,1935 105,1965 105,2070 135,2100
5V on Bottom Layer "5V_L04_P116" (solid, pour order 116): 180,1890 165,1875 165,1800 180,1785 630,1785 1153.91,1230 1290,1230 1335,1275 1335,1440 1290,1485 1106.31,1485 701.31,1890
-5V on Bottom Layer "-5V_L04_P114" (solid, pour order 114): 1500,645 1530,675 1530,885 1635,990 1635,1575 1575,1635 1385,1635 1307.5,1557.5 1395,1470 1395,675 1425,645
-5V on Bottom Layer "-5V_L04_P112" (solid, pour order 112): 1335,1635 1200,1635 1185,1620 1185,1590 1230,1545 1455,1545 1530,1470 1660,1470 1705,1515 1705,1770.79 1470.79,1770.79 1455,1755
3V3 on Bottom Layer "3V3_L04_P111" (solid, pour order 111): 1185,690 1275,600 1995,600 2085,690 2400,690 2445,645 2445,555 2325,435 1080,435 990,525 990,705 1005,720 1170,720 1185,705
3V3 on Bottom Layer "3V3_L04_P110" (solid, pour order 110): 1140,1065 1185,1020 1185,690 1140,645 1035,645 990,690 990,1020 1035,1065
3V3 on Bottom Layer "3V3_L04_P096" (solid, pour order 96): 2190,555 2445,555 2580,690 2580,990 2655,1065 2730,1140 2730,1290 2670,1350 2415,1350 2070,1005 2070,675
-5V on Bottom Layer "-5V_L04_P092" (solid, pour order 92): 1725,2010 1785,1950 1785,1800 1725,1740 1530,1740 1515,1725 1455,1725 1440,1740 1440,1830 1530,1920 1530,1980 1560,2010
3V3 on Bottom Layer "3V3_L04_P065" (solid, pour order 65): 2730,2235 2415,1920 2415,1185 2460,1140 3525,1140 3875,1490 3875,2020 3660,2235 3645,2235
GND on Middle 2 Layer "GND_L03_P073" (solid, pour order 73): 0,5000 0,0 4100,0 4100,5000
GND on Middle 1 Layer "GND_L02_P072" (solid, pour order 72): 0,5000 0,0 4100,0 4100,5000

## Keep-outs
Keep-Out Layer:
  region: 3610,10 3610,290 3620,300 3620,325 3630,335 3630,355 3635,360 3640,360 3640,365 3645,370 3645,380 3655,390 3655,395 3705,445 3715,445 3730,460 3740,460 3755,475 3775,475 3785,485 3815,485 3820,490 4090,490 4090,185 4075,170 4075,155 4060,140 4060,125 4045,110 4045,105 3975,35 3945,35 3940,30 3935,25 3930,25 3920,15 3855,15 3850,10
  region: 4090,4505 4090,4785 4080,4795 4080,4820 4070,4830 4070,4850 4065,4855 4060,4855 4060,4860 4055,4865 4055,4875 4045,4885 4045,4890 3995,4940 3985,4940 3970,4955 3960,4955 3945,4970 3925,4970 3915,4980 3885,4980 3880,4985 3610,4985 3609.97,4701.36 3615,4680 3625,4665 3625,4650 3640,4635 3640,4620 3655,4605 3655,4600 3725,4530 3755,4530 3760,4525 3765,4520 3770,4520 3780,4510 3850,4505
  region: 9.97,4510 9.97,4785 19.97,4795 19.97,4820 29.97,4830 29.97,4850 34.97,4855 39.97,4855 39.97,4860 44.97,4865 44.97,4875 54.97,4885 54.97,4890 104.97,4940 114.99,4945.01 129.97,4955 139.99,4960.01 154.97,4970 175.07,4975.1 184.97,4980 214.09,4985 219.97,4985 489.97,4985 484.97,4700 480,4680 474.97,4665 469.95,4650.02 459.97,4635 455,4620 444.97,4605 439.99,4600.01 369.99,4539.99 344.97,4530 339.97,4525 334.97,4520 329.97,4520 315,4520 271.65,4510
  region: 489.97,10 489.97,285 485,295 479.97,320 474.99,330.01 469.97,350 459.97,360 459.97,365 454.97,375 444.97,385 444.97,390 394.97,440 384.99,444.99 369.97,455 359.99,459.99 344.97,470 330.09,474.91 314.97,480 255.03,490 9.88,490 14.97,200 19.94,180 24.97,165 29.99,150.02 39.97,135 44.94,120 54.97,105 59.96,100.01 129.96,39.99 154.97,30 159.97,25 164.97,20 169.97,20 184.94,20 228.3,10
  lines w10: 0,250 ccw(c250,250) 250,0 3850,0 ccw(c3850,250) 4100,250 4100,4750 ccw(c3850,4750) 3850,5000 250,5000 ccw(c250,4750) 0,4750 0,250 ; 10,250 ccw(c250,250) 250,10 490,10 490,250 ccw(c250,250) 250,490 80,490 10,490 10,250 ; 10,4510 250,4510 ccw(c250,4750) 490,4750 490,4990 250,4990 ccw(c250,4750) 10,4750 10,4580 10,4510 ; 3610,10 3850,10 ccw(c3850,250) 4090,250 4090,490 3850,490 ccw(c3850,250) 3610,250 3610,10 ; 3610,4745 ccw(c3850,4745) 3850,4505 4090,4505 4090,4745 ccw(c3850,4745) 3850,4985 3680,4985 3610,4985 3610,4745

## Other copper
Middle 1 Layer:
  pour cut-out: 2730,2235 2895,2235 2910,2220 2910,2085 2820,1995 2632.5,1995 2617.5,2010 2617.5,2122.5
  pour cut-out: 1770,1440 2010,1440 2115,1335 2115,1125 2100,1110 1845,1110 1740,1215 1740,1410
  pour cut-out: 735,3075 750,3060 750,2985 735,2970 660,2970 645,2985 645,3060 660,3075
  pour cut-out: 975,3030 990,3015 990,2940 975,2925 900,2925 885,2940 885,3015 900,3030
  pour cut-out: 540,3030 555,3015 555,2940 540,2925 465,2925 450,2940 450,3015 465,3030
  pour cut-out: 300,3075 315,3060 315,2985 300,2970 225,2970 210,2985 210,3060 225,3075
  pour cut-out: 1500,765 1515,750 1515,675 1500,660 1425,660 1410,675 1410,750 1425,765
  pour cut-out: 1650,1500 1635,1485 1575,1485 1560,1500 1560,1620 1575,1635 1635,1635 1650,1620
  pour cut-out: 1215,1635 1320,1635 1365,1590 1365,1575 1335,1545 1245,1545 1197.28,1592.72 1197.28,1617.28
  pour cut-out: 1065,975 1080,960 1080,750 1065,735 990,735 975,750 975,960 990,975
  pour cut-out: 930,2550 945,2535 945,2460 930,2445 855,2445 840,2460 840,2535 855,2550
  pour cut-out: 690,2670 705,2655 705,2580 690,2565 615,2565 600,2580 600,2655 615,2670
  pour cut-out: 480,2550 495,2535 495,2460 480,2445 405,2445 390,2460 390,2535 405,2550
  pour cut-out: 240,2670 255,2655 255,2580 240,2565 165,2565 150,2580 150,2655 165,2670
  pour cut-out: 255,1890 270,1875 270,1800 255,1785 180,1785 165,1800 165,1875 180,1890
  pour cut-out: 701.31,1890 716.31,1875 716.31,1800 701.31,1785 626.31,1785 611.31,1800 611.31,1875 626.31,1890
  pour cut-out: 641.31,2100 656.31,2085 656.31,2010 641.31,1995 566.31,1995 551.31,2010 551.31,2085 566.31,2100
  pour cut-out: 195,2100 210,2085 210,2010 195,1995 120,1995 105,2010 105,2085 120,2100
  pour cut-out: 2190,720 2445,720 2460,705 2460,585 2445,570 2190,570 2175,585 2175,705
  pour cut-out: 1650,2025 1665,2010 1665,1965 1635,1935 1575,1935 1545,1965 1545,2010 1560,2025
Middle 2 Layer:
  pour cut-out: 2730,2235 2895,2235 2910,2220 2910,2085 2820,1995 2632.5,1995 2617.5,2010 2617.5,2122.5
  pour cut-out: 1770,1440 2010,1440 2115,1335 2115,1125 2100,1110 1845,1110 1740,1215 1740,1410
  pour cut-out: 975,3030 990,3015 990,2940 975,2925 900,2925 885,2940 885,3015 900,3030
  pour cut-out: 735,3075 750,3060 750,2985 735,2970 660,2970 645,2985 645,3060 660,3075
  pour cut-out: 540,3030 555,3015 555,2940 540,2925 465,2925 450,2940 450,3015 465,3030
  pour cut-out: 300,3075 315,3060 315,2985 300,2970 225,2970 210,2985 210,3060 225,3075
  pour cut-out: 1500,765 1515,750 1515,675 1500,660 1425,660 1410,675 1410,750 1425,765
  pour cut-out: 1650,1500 1635,1485 1575,1485 1560,1500 1560,1620 1575,1635 1635,1635 1650,1620
  pour cut-out: 1215,1635 1320,1635 1365,1590 1365,1575 1335,1545 1245,1545 1197.28,1592.72 1197.28,1617.28
  pour cut-out: 1065,975 1080,960 1080,750 1065,735 990,735 975,750 975,960 990,975
  pour cut-out: 2190,720 2445,720 2460,705 2460,585 2445,570 2190,570 2175,585 2175,705
  pour cut-out: 930,2550 945,2535 945,2460 930,2445 855,2445 840,2460 840,2535 855,2550
  pour cut-out: 690,2670 705,2655 705,2580 690,2565 615,2565 600,2580 600,2655 615,2670
  pour cut-out: 480,2550 495,2535 495,2460 480,2445 405,2445 390,2460 390,2535 405,2550
  pour cut-out: 240,2670 255,2655 255,2580 240,2565 165,2565 150,2580 150,2655 165,2670
  pour cut-out: 641.31,2100 656.31,2085 656.31,2010 641.31,1995 566.31,1995 551.31,2010 551.31,2085 566.31,2100
  pour cut-out: 701.31,1890 716.31,1875 716.31,1800 701.31,1785 626.31,1785 611.31,1800 611.31,1875 626.31,1890
  pour cut-out: 255,1890 270,1875 270,1800 255,1785 180,1785 165,1800 165,1875 180,1890
  pour cut-out: 195,2100 210,2085 210,2010 195,1995 120,1995 105,2010 105,2085 120,2100
  pour cut-out: 1650,2025 1665,2010 1665,1965 1635,1935 1575,1935 1545,1965 1545,2010 1560,2025
Bottom Layer:
  pour cut-out: 1230,2025 1320,2025 1335,2010 1335,1890 1320,1875 1230,1875 1215,1890 1215,2010
  pour cut-out: 1470,2010 1485,1995 1485,1905 1470,1890 1380,1890 1365,1905 1365,1995 1380,2010

## Silkscreen, mask and mechanical layers (free items; w line width, h text height)
Top Overlay:
  drawing of 185 lines, arcs and shapes, not listed
  text "The Underwater" at 1090,4870 h60
  text "Robotics Team" at 1105,4765 h60
  text "Acoustics Board" at 1105,4645 h60
  text "ADC Small Signal" at 1190,4470 h30
  text "-5V" at 935,4389.99 h30 r270
  text "+5V" at 1025,4389.99 h30 r270
  text "Hydro.P" at 930,4267.47 h30 r270
  text "GND" at 1025,4209.99 h30 r270
  text "Term On" at 2800,4155 h40 r90
  text "-5V" at 935,3969.99 h30 r270
  text "+5V" at 1025,3969.99 h30 r270
  text "Hydro.S" at 930,3847.47 h30 r270
  text "GND" at 1025,3789.99 h30 r270
  text "Reset" at 2217.07,3690 h30 r315
  text "Mult R" at 60,3520 h30 r270
  text "Mult L" at 990,3520 h30 r270
  text "HydrophoneR" at 120,3370 h30
  text "HydrophoneL" at 570,3365 h30
  text "Local Oscillator" at 1040,3305 h30
  text "DDS" at 1500,3265 h30 r270
  text "DDS Clock" at 1190,2795 h30
  text "Converter" at 1145,2725 h30 r270
  text "+5V to -5V" at 1190,2725 h30 r270
  text "Boot" at 2866,2643 h30
  text "Point R" at 60,2605 h30 r270
  text "Point L" at 990,2605 h30 r270
  text "Dongle" at 3155,2508.33 h40
  text "Power" at 3155,2455.01 h40
  text "Trans.L" at 3710,2260 h22
  text "Trans.R" at 3890,2260 h22
  text "Hydro.L" at 3710,2202.33 h22
  text "GND" at 3935,2200 h22
  text "Post BPF Amp R" at 60,2080 h30 r270
  text "Post BPF Amp L" at 1065,2075 h30 r270
  text "RESET" at 2640.74,1987.78 h40 r180
  text "BOOT" at 2856.97,1987.78 h40 r180
  text "Env. R" at 60,1540 h30 r270
  text "Env. L" at 990,1540 h30 r270
  text "TERM / ON" at 2413.15,1343.27 h40 r180
  text "Trans.L" at 125,1285 h22 r270
  text "GND" at 185,1242.85 h22 r270
  text "Trans.R" at 125,1105 h22 r270
  text "GND" at 185,1062.85 h22 r270
  text "Comparator" at 930,875 h30 r270
  text "5V" at 2780,800 h30
  text "Out R" at 1835,635 h30 r270
  text "Out L" at 1925,605 h30 r270
  text "3V3" at 2105,470 h30
  text "Stack Link" at 3035,50 h50

## Text inside footprints (layer, text, board x,y; h text height)
CR1: Top Overlay "*" at 2062,2162.5 h50 r90; Mechanical 13 "*" at 1928,2287.5 h50 r90
S1: Top Overlay "*" at 3108,2797.48 h50; Mechanical 13 "*" at 3143,2797.48 h50